# Altium PCB 12V-036A3（7X7）-WaterPump-200W-V1.0.PcbDoc (part 2 of 2)
Units mm, origin at the board's own origin, x right, y up, seen from the top; angles counter-clockwise.
Board outline 61.5 x 61.42 mm, 4 copper layers (Top Layer, Signal Layer 1, Signal Layer 2, Bottom Layer), stack 0.778 mm thick; 140 components, 56 nets, 337 pads, 796 vias.
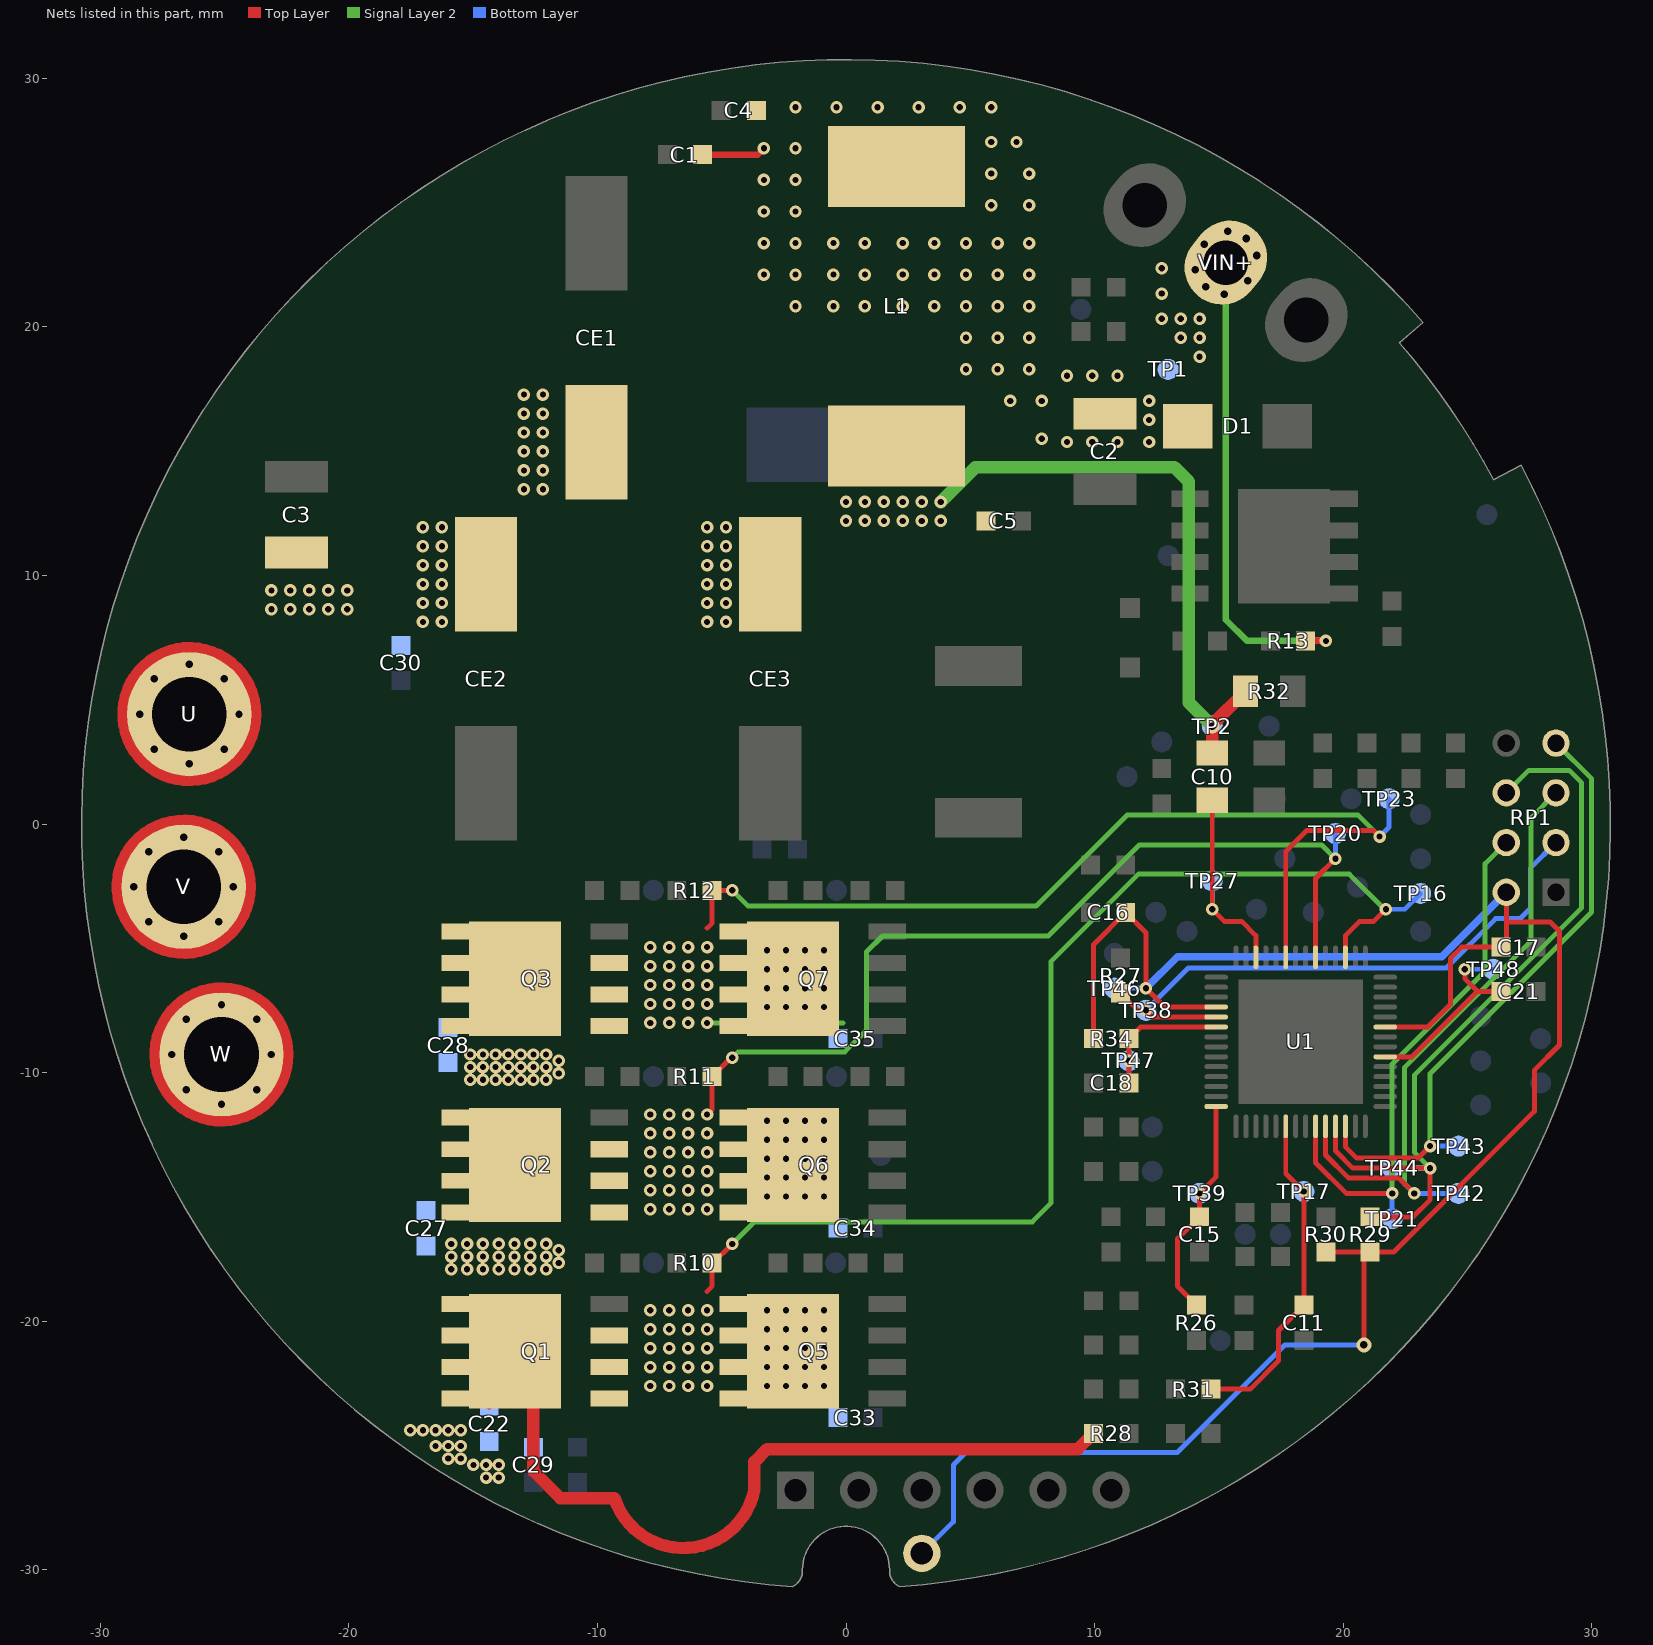
[diagram p4: the nets of this part, all layers, seen from the top]

## Via types
v1: diameter 0.5, hole 0.25, Top Layer to Bottom Layer, tented both sides, 744 vias
v2: diameter 0.6, hole 0.3, Top Layer to Bottom Layer, tented both sides, 28 vias
v3: diameter 0.61, hole 0.305, Top Layer to Bottom Layer, 24 vias

## Nets (pads, with @x,y where several pads share a name; then routed paths per layer and width w, separated by ;. In a path a pad name is that pad's centre, name@x,y a point inside that pad or via, vN(x,y) a via of type N, cw(c..) or ccw(c..) an arc to the next point about the centre after c; other vN are vias at no path point) (continued)
TCK: RP1.7 TP43.1 U1.12 | length 25.3
  Top Layer w0.2: U1.12@20.088,-12.163 20.088,-12.981 20.55,-13.443 23.006,-13.443 v1(23.495,-12.954)
  Signal Layer 2 w0.2: v1(23.495,-12.954) 23.495,-10.033 29.991,-3.537 29.991,1.822 RP1.7@28.559,3.254
  Bottom Layer w0.2: v1(23.495,-12.954) TP43.1@24.638,-12.954
TDI: RP1.4 TP21.1 U1.9 | length 22.1
  Top Layer w0.2: U1.9@18.888,-12.163 18.888,-13.623 20.124,-14.859 v1(21.971,-14.859)
  Signal Layer 2 w0.2: v1(21.971,-14.859) 21.971,-9.652 25.709,-5.914 25.709,-1.596 RP1.4@26.559,-0.746
  Bottom Layer w0.2: TP21.1@21.971,-15.875 v1(21.971,-14.859)
TDO: R29.2 RP1.6 TP44.1 U1.11 | length 32.7
  Top Layer w0.2: U1.11@19.688,-12.163 19.688,-13.146 20.385,-13.843 v1(23.495,-13.843) 23.495,-15.113 22.809,-15.799 R29.2@21.082,-15.799
  Signal Layer 2 w0.2: v1(23.495,-13.843) 22.86,-13.208 22.86,-10.102 29.591,-3.371 29.591,1.656 29.088,2.159 27.464,2.159 RP1.6@26.559,1.254
  Bottom Layer w0.2: TP44.1@21.971,-13.843 v1(23.495,-13.843)
TMS: RP1.5 TP42.1 U1.10 | length 25.9
  Top Layer w0.2: U1.10@19.288,-12.163 19.288,-13.312 20.219,-14.243 22.244,-14.243 v1(22.86,-14.859)
  Signal Layer 2 w0.2: v1(22.86,-14.859) 22.46,-14.459 22.46,-9.798 27.559,-4.699 27.559,0.254 RP1.5@28.559,1.254
  Bottom Layer w0.2: v1(22.86,-14.859) TP42.1@24.638,-14.859
TRSTn: R27.2 RP1.3 TP38.1 U1.47 | length 24.5
  Top Layer w0.2: R27.2@11.049,-6.807 11.735,-7.493 v1(12.065,-7.493) 12.335,-7.763 U1.47@14.888,-7.763
  Bottom Layer w0.2: v1(12.065,-7.493) 13.774,-5.784 24.157,-5.784 26.131,-3.81 27.114,-3.81 27.527,-3.397 27.527,-1.778 RP1.3@28.559,-0.746
U: C28.2 C35.1 Q3.1 Q3.2 Q3.3 Q7.5 Q7.6 Q7.7 Q7.8 Q7.9 R12.1 TP23.1 U1.37 U.1 | length 61.9
  Top Layer w0.2: -5.588,-4.191 -5.385,-3.988 R12.1@-5.385,-2.667 v1(-4.572,-2.667) ; U1.37@17.688,-5.363 17.688,-1.108 18.542,-0.254 21.209,-0.254 v1(21.463,-0.508)
  Top Layer w0.8: -23.916,4.42 ccw(c-26.416,4.42) -23.916,4.42
  Signal Layer 2 w0.2: v1(-5.588,-8.001) -0.127,-8.001 ; v1(-4.572,-2.667) -3.937,-3.302 7.645,-3.302 11.3,0.353 20.602,0.353 v1(21.463,-0.508)
  Bottom Layer w0.2: v1(21.463,-0.508) 21.844,-0.127 TP23.1@21.844,1.016
  other v1: -7.874,-8.001 -7.112,-8.001 -6.35,-8.001 -3.175,-7.366 -2.413,-7.366 -1.651,-7.366 -0.889,-7.366 -7.874,-7.239 -7.112,-7.239 -6.35,-7.239 -5.588,-7.239 -3.175,-6.604 -2.413,-6.604 -1.651,-6.604 -0.889,-6.604 -7.874,-6.477 -7.112,-6.477 -6.35,-6.477 -5.588,-6.477 -3.175,-5.842 -2.413,-5.842 -1.651,-5.842 -0.889,-5.842 -7.874,-5.715 -7.112,-5.715 -6.35,-5.715 -5.588,-5.715 -3.175,-5.08 -2.413,-5.08 -1.651,-5.08 -0.889,-5.08 -7.874,-4.953 -7.112,-4.953 -6.35,-4.953 -5.588,-4.953
  other v2: -26.416,2.42 -27.83,3.006 -25.002,3.006 -28.416,4.42 -24.416,4.42 -27.83,5.834 -25.002,5.834 -26.416,6.42
V: C27.2 C34.1 Q2.1 Q2.2 Q2.3 Q6.5 Q6.6 Q6.7 Q6.8 Q6.9 R11.1 TP20.1 U1.34 V.1 | length 53.6
  Top Layer w0.2: v1(-5.588,-11.684) -5.385,-11.481 R11.1@-5.385,-10.16 -4.623,-9.398 v1(-4.572,-9.398) ; U1.34@18.888,-5.363 18.888,-2.194 v1(19.685,-1.397)
  Top Layer w0.8: -24.141,-2.524 ccw(c-26.641,-2.524) -24.141,-2.524
  Signal Layer 2 w0.2: v1(-4.572,-9.398) -4.337,-9.163 -0.045,-9.163 0.827,-8.291 0.827,-5.142 1.467,-4.502 8.142,-4.502 11.797,-0.847 19.135,-0.847 v1(19.685,-1.397)
  Bottom Layer w0.2: v1(19.685,-1.397) TP20.1@19.685,-0.381
  other v1: -7.874,-15.494 -7.112,-15.494 -6.35,-15.494 -5.588,-15.494 -3.175,-14.986 -2.413,-14.986 -1.651,-14.986 -0.889,-14.986 -7.874,-14.732 -7.112,-14.732 -6.35,-14.732 -5.588,-14.732 -3.175,-14.224 -2.413,-14.224 -1.651,-14.224 -0.889,-14.224 -7.874,-13.97 -7.112,-13.97 -6.35,-13.97 -5.588,-13.97 -3.175,-13.462 -2.413,-13.462 -1.651,-13.462 -0.889,-13.462 -7.874,-13.208 -7.112,-13.208 -6.35,-13.208 -5.588,-13.208 -3.175,-12.7 -2.413,-12.7 -1.651,-12.7 -0.889,-12.7 -7.874,-12.446 -7.112,-12.446 -6.35,-12.446 -5.588,-12.446 -3.175,-11.938 -2.413,-11.938 -1.651,-11.938 -0.889,-11.938 -7.874,-11.684 -7.112,-11.684 -6.35,-11.684
  other v2: -26.641,-4.524 -28.055,-3.938 -25.227,-3.938 -28.641,-2.524 -24.641,-2.524 -28.055,-1.11 -25.227,-1.11 -26.641,-0.524
VBUS: C11.2 R31.2 TP17.1 U1.6 | length 13.3
  Top Layer w0.2: R31.2@14.681,-22.733 16.256,-22.733 17.399,-21.59 17.399,-20.371 C11.2@18.415,-19.355 v1(18.415,-14.783) 17.688,-14.056 U1.6@17.688,-12.163
VCP: C10.1 TP27.1 U1.40 | length 8.6
  Top Layer w0.2: C10.1@14.732,0.953 v1(14.732,-3.429) 15.221,-3.918 15.914,-3.918 16.488,-4.492 U1.40@16.488,-5.363
  Bottom Layer w0.2: v1(14.732,-3.429) TP27.1@14.732,-2.286
VDD: C21.2 TP48.1 U1.20 | length 8
  Top Layer w0.2: U1.20@21.688,-9.363 22.768,-9.363 25.4,-6.731 ; v1(24.892,-5.842) 24.892,-6.223 25.4,-6.731 ; C21.2@26.34,-6.731 25.4,-6.731
  Bottom Layer w0.2: v1(24.892,-5.842) TP48.1@26.035,-5.842
VDD5V: C16.2 C17.2 pad.1 R29.1 R30.1 R34.2 RP1.2 TP46.1 U1.23 U1.46 | length 86.3
  Top Layer w0.2: R34.2@9.957,-8.636 9.957,-4.851 C16.2@11.252,-3.556 12.065,-4.369 v1(12.065,-6.604) 12.824,-7.363 U1.46@14.888,-7.363 ; C16.2@11.189,-3.492 C16.2@11.252,-3.429 ; R30.1@19.304,-17.221 R29.1@20.955,-17.221 ; v2(20.828,-20.955) 20.828,-17.348 R29.1@20.955,-17.221 ; R29.1@21.018,-17.158 R29.1@21.082,-17.094 ; U1.23@21.688,-8.163 23.402,-8.163 24.314,-7.251 24.314,-5.404 24.765,-4.953 C17.2@26.34,-4.953 26.559,-4.734 26.559,-3.937 ; RP1.2@26.741,-2.746 RP1.2@26.559,-2.746 26.559,-3.937 ; R29.1@20.955,-17.221 R29.1@21.082,-17.221 22.022,-17.221 27.686,-11.557 27.686,-9.906 28.702,-8.89 28.702,-4.318 28.321,-3.937 26.559,-3.937
  Bottom Layer w0.2: pad.1@3.048,-29.337 4.318,-28.067 4.318,-25.781 4.826,-25.273 13.335,-25.273 17.653,-20.955 v2(20.828,-20.955) ; TP46.1@10.795,-6.604 v1(12.065,-6.604)
  Bottom Layer w0.3: v1(12.065,-6.604) 13.335,-5.334 23.971,-5.334 RP1.2@26.559,-2.746
VDDA: C15.2 R26.2 TP39.1 U1.56 | length 9
  Top Layer w0.2: R26.2@14.097,-19.355 13.335,-18.593 13.335,-16.688 C15.2@14.224,-15.799 v1(14.224,-14.859) 14.888,-14.195 U1.56@14.888,-11.363
VIN: C1.2 C2.1 C4.2 D1.2 L1.1 R13.2 TP1.1 VIN+.1 | length 22.1
  Top Layer w0.254: C1.2@-5.766,26.924 -3.556,26.924 v1(-3.302,27.178) ; R13.2@18.491,7.366 v1(19.304,7.366)
  Signal Layer 2 w0.254: VIN+.1@15.28,22.58 15.28,8.215 16.129,7.366 v1(19.304,7.366)
  other v1: 8.89,15.367 9.906,15.367 10.922,15.367 12.192,15.367 7.874,15.494 12.192,16.256 6.604,17.018 7.874,17.018 12.192,17.018 8.89,18.034 9.906,18.034 10.922,18.034 4.826,18.288 6.096,18.288 7.366,18.288 14.224,18.796 4.826,19.558 6.096,19.558 7.366,19.558 13.462,19.558 14.224,19.558 12.7,20.32 13.462,20.32 14.224,20.32 -2.032,20.828 -0.508,20.828 0.762,20.828 2.286,20.828 3.556,20.828 4.826,20.828 6.096,20.828 7.366,20.828 12.7,21.336 -3.302,22.098 -2.032,22.098 -0.508,22.098 0.762,22.098 2.286,22.098 3.556,22.098 4.826,22.098 6.096,22.098 7.366,22.098 12.7,22.352 -3.302,23.368 -2.032,23.368 -0.508,23.368 0.762,23.368 2.286,23.368 3.556,23.368 4.826,23.368 6.096,23.368 7.366,23.368 -3.302,24.638 -2.032,24.638 5.842,24.892 7.366,24.892 -3.302,25.908 -2.032,25.908 5.842,26.162 7.366,26.162 -2.032,27.178 5.842,27.432 6.858,27.432 -2.032,28.829 -0.381,28.829 1.27,28.829 2.921,28.829 4.572,28.829 5.842,28.829
  other v3: 15.211,21.312 14.464,21.607 16.156,21.845 14.043,22.292 16.517,22.868 14.404,23.315 16.096,23.553 15.349,23.848
VM: C3.1 C5.1 C10.2 C22.1 C27.1 C28.1 C29.1 C30.1 CE1.1 CE2.1 CE3.1 L1.2 Q1.5 Q1.6 Q1.7 Q1.8 Q1.9 Q2.5 Q2.6 Q2.7 Q2.8 Q2.9 Q3.5 Q3.6 Q3.7 Q3.8 Q3.9 R28.1 R32.2 TP2.1 | length 56.9
  Top Layer w0.381: Q1.8@-15.371,-23.114 -14.605,-23.114 Q1.9@-14.351,-23.368 ; Q1.9@-13.31,-21.209 Q1.9@-12.573,-21.946
  Top Layer w0.5: Q1.9@-12.573,-21.946 -12.573,-26.035 -11.495,-27.113 -9.315,-27.113 ccw(c-6.545,-26.212) -3.687,-26.771 -3.687,-25.658 -3.175,-25.146 9.322,-25.146 R28.1@9.957,-24.511
  Top Layer w0.508: C10.2@14.732,2.857 v2(14.732,3.937) 14.732,4 R32.2@16.066,5.334
  Signal Layer 2 w0.508: v1(3.81,12.954) 5.207,14.351 13.208,14.351 13.791,13.768 13.791,4.878 v2(14.732,3.937)
  other v1: -14.478,-26.289 -13.97,-26.289 -14.986,-25.781 -14.478,-25.781 -13.97,-25.781 -16.002,-25.527 -15.494,-25.527 -16.51,-25.019 -16.002,-25.019 -15.494,-25.019 -17.526,-24.384 -17.018,-24.384 -16.51,-24.384 -16.002,-24.384 -15.494,-24.384 -15.875,-17.907 -15.24,-17.907 -14.605,-17.907 -13.97,-17.907 -13.335,-17.907 -12.7,-17.907 -12.065,-17.907 -11.557,-17.653 -15.875,-17.399 -15.24,-17.399 -14.605,-17.399 -13.97,-17.399 -13.335,-17.399 -12.7,-17.399 -12.065,-17.399 -11.557,-17.145 -15.875,-16.891 -15.24,-16.891 -14.605,-16.891 -13.97,-16.891 -13.335,-16.891 -12.7,-16.891 -12.065,-16.891 -15.113,-10.287 -14.605,-10.287 -14.097,-10.287 -13.589,-10.287 -13.081,-10.287 -12.573,-10.287 -12.065,-10.287 -11.557,-10.033 -15.113,-9.779 -14.605,-9.779 -14.097,-9.779 -13.589,-9.779 -13.081,-9.779 -12.573,-9.779 -12.065,-9.779 -11.557,-9.525 -15.113,-9.271 -14.605,-9.271 -14.097,-9.271 -13.589,-9.271 -13.081,-9.271 -12.573,-9.271 -12.065,-9.271 -17.018,8.128 -16.256,8.128 -5.588,8.128 -4.826,8.128 -23.114,8.636 -22.352,8.636 -21.59,8.636 -20.828,8.636 -20.066,8.636 -17.018,8.89 -16.256,8.89 -5.588,8.89 -4.826,8.89 -23.114,9.398 -22.352,9.398 -21.59,9.398 -20.828,9.398 -20.066,9.398 -17.018,9.652 -16.256,9.652 -5.588,9.652 -4.826,9.652 -17.018,10.414 -16.256,10.414 -5.588,10.414 -4.826,10.414 -17.018,11.176 -16.256,11.176 -5.588,11.176 -4.826,11.176 -17.018,11.938 -16.256,11.938 -5.588,11.938 -4.826,11.938 0,12.192 0.762,12.192 1.524,12.192 2.286,12.192 3.048,12.192 3.81,12.192 0,12.954 0.762,12.954 1.524,12.954 2.286,12.954 3.048,12.954 -12.954,13.462 -12.192,13.462 -12.954,14.224 -12.192,14.224 -12.954,14.986 -12.192,14.986 -12.954,15.748 -12.192,15.748 -12.954,16.51 -12.192,16.51 -12.954,17.272 -12.192,17.272
W: C22.2 C33.1 Q1.1 Q1.2 Q1.3 Q5.5 Q5.6 Q5.7 Q5.8 Q5.9 R10.1 TP16.1 U1.31 W.1 | length 61.4
  Top Layer w0.2: -5.588,-18.796 -5.385,-18.593 R10.1@-5.385,-17.653 -5.334,-17.653 v1(-4.572,-16.891) ; U1.31@20.088,-5.363 20.088,-4.492 20.662,-3.918 21.228,-3.918 v1(21.717,-3.429)
  Top Layer w0.8: -22.621,-9.271 ccw(c-25.121,-9.271) -22.621,-9.271
  Signal Layer 2 w0.2: v1(-4.572,-16.891) -3.683,-16.002 7.493,-16.002 8.255,-15.24 8.255,-5.52 11.756,-2.019 20.249,-2.019 21.659,-3.429 v1(21.717,-3.429)
  Bottom Layer w0.2: v1(21.717,-3.429) 22.479,-3.429 TP16.1@23.114,-2.794
  other v1: -7.874,-22.606 -7.112,-22.606 -6.35,-22.606 -5.588,-22.606 -3.175,-22.606 -2.413,-22.606 -1.651,-22.606 -0.889,-22.606 -7.874,-21.844 -7.112,-21.844 -6.35,-21.844 -5.588,-21.844 -3.175,-21.844 -2.413,-21.844 -1.651,-21.844 -0.889,-21.844 -7.874,-21.082 -7.112,-21.082 -6.35,-21.082 -5.588,-21.082 -3.175,-21.082 -2.413,-21.082 -1.651,-21.082 -0.889,-21.082 -7.874,-20.32 -7.112,-20.32 -6.35,-20.32 -5.588,-20.32 -3.175,-20.32 -2.413,-20.32 -1.651,-20.32 -0.889,-20.32 -7.874,-19.558 -7.112,-19.558 -6.35,-19.558 -5.588,-19.558 -3.175,-19.558 -2.413,-19.558 -1.651,-19.558 -0.889,-19.558
  other v2: -25.121,-11.271 -26.535,-10.685 -23.707,-10.685 -27.121,-9.271 -23.121,-9.271 -26.535,-7.857 -23.707,-7.857 -25.121,-7.271
XRS: C18.1 R34.1 TP47.1 U1.48 | length 5.5
  Top Layer w0.2: C18.1@11.379,-10.414 R34.1@11.379,-8.636 11.852,-8.163 12.684,-8.163 U1.48@14.888,-8.163
  other v1: 11.379,-9.525
pads on no net: U1.17 U1.18 U1.21 U1.22

## Polygon pours and split planes (outlines as drawn)
GND on Bottom Layer "GND_L02_P064" (solid, remove dead copper, pour order 108): 9.398,3.937 9.398,-23.622 7.874,-25.146 7.874,-29.21 8.636,-29.972 27.178,-29.972 32.385,-24.765 32.385,3.302 31.369,4.318 9.779,4.318
NetC19_1 on Bottom Layer "NETC19_1_L04_P004" (solid, remove dead copper, pour order 4): 21.463,25.654 15.621,19.812 15.621,8.636 15.748,8.509 24.003,8.509 28.194,12.7 28.194,18.415 20.955,25.654
VIN on Bottom Layer "VIN_L04_P018" (solid, remove dead copper, pour order 18): -4.064,30.988 -4.064,18.669 -3.302,17.907 3.81,17.907 6.731,14.986 14.732,14.986 15.24,15.494 15.24,20.066 19.812,24.638 19.812,26.797 14.732,31.877 -3.175,31.877
GND on Bottom Layer "GND_L04_P032" (solid, remove dead copper, pour order 32): 6.985,13.97 13.97,13.97 14.605,13.335 14.605,9.398 9.906,4.699 3.302,4.699 2.286,3.683 2.286,1.524 0.508,-0.254 -12.446,-0.254 -16.002,3.302 -16.002,5.588 -15.24,6.35 -1.905,6.35 2.54,10.795 6.096,10.795 6.477,11.176 6.477,13.462
VM on Bottom Layer "VM_L04_P066" (solid, remove dead copper, pour order 66): -24.511,11.811 -24.511,7.493 -23.749,6.731 -2.159,6.731 2.286,11.176 5.842,11.176 6.096,11.43 6.096,13.081 5.715,13.462 -4.445,13.462 -5.08,14.097 -5.08,18.288 -5.461,18.669 -12.827,18.669 -19.177,12.319 -24.003,12.319
R+ on Bottom Layer "R+_L04_P074" (solid, remove dead copper, pour order 74): 8.001,1.905 3.683,1.905 0.635,-1.143 0.635,-24.257 0.762,-24.384 2.032,-24.384 8.001,-24.384 8.763,-23.622 8.763,1.143
W on Bottom Layer "W_L04_P076" (solid, remove dead copper, pour order 76): -24.638,-5.842 -22.225,-8.255 -22.225,-12.7 -16.51,-18.415 -0.127,-18.415 0.127,-18.669 0.127,-23.622 -0.127,-23.876 -26.035,-23.876 -30.734,-19.177 -30.734,-7.874 -28.702,-5.842
V on Bottom Layer "V_L04_P082" (solid, remove dead copper, pour order 82): -29.591,0 -29.591,-4.572 -28.702,-5.461 -24.511,-5.461 -21.844,-8.128 -21.844,-12.573 -18.161,-16.256 -0.254,-16.256 0.127,-15.875 0.127,-11.43 -0.381,-10.922 -16.256,-10.922 -16.764,-10.414 -16.764,-6.096 -23.749,0.889 -28.702,0.889
U on Bottom Layer "U_L04_P086" (solid, remove dead copper, pour order 86): -29.591,6.096 -29.591,2.159 -28.702,1.27 -23.622,1.27 -16.383,-5.969 -16.383,-8.636 -16.256,-8.763 -0.381,-8.763 0.127,-8.255 0.127,-4.064 0.127,-3.81 -0.254,-3.429 -11.176,-3.429 -20.955,6.35 -23.876,6.35 -24.892,7.366 -28.321,7.366
VM on Bottom Layer "VM_L04_P092" (solid, remove dead copper, pour order 92): -12.446,-24.13 -12.065,-24.511 -12.065,-25.527 -12.192,-25.654 -13.081,-25.654 -13.335,-25.908 -13.335,-26.67 -13.716,-27.051 -18.034,-27.051 -18.669,-26.416 -18.669,-24.638 -18.161,-24.13
NetC19_1 on Top Layer "NETC19_1_L01_P002" (solid, remove dead copper, pour order 2): 21.463,25.654 15.621,19.812 15.621,8.636 15.748,8.509 24.003,8.509 28.194,12.7 28.194,18.415 20.955,25.654
VIN on Top Layer "VIN_L01_P012" (solid, remove dead copper, pour order 12): -4.064,21.59 -2.032,19.558 2.794,19.558 7.62,14.732 14.478,14.732 15.24,15.494 15.24,20.066 19.812,24.638 19.812,25.4 18.288,26.924 16.764,26.924 12.192,22.352 12.192,19.304 11.811,18.923 8.763,18.923 8.636,19.05 8.636,26.67 5.588,29.718 -3.556,29.718 -4.064,29.21
GND on Top Layer "GND_L01_P030" (solid, remove dead copper, pour order 30): 7.239,14.224 14.478,14.224 15.113,13.589 15.113,10.16 14.859,9.906 12.7,9.906 12.573,9.779 12.573,8.255 12.192,7.874 9.398,7.874 8.763,7.239 8.763,4.953 8.509,4.699 3.302,4.699 2.286,3.683 2.286,1.524 -0.381,-1.143 -16.002,-1.143 -16.764,-0.381 -16.764,4.826 -15.24,6.35 -1.905,6.35 2.54,10.795 6.096,10.795 6.477,11.176 6.477,13.462
GND on Top Layer "GND_L01_P068" (solid, remove dead copper, pour order 68): -27.813,20.828 -27.813,14.732 -25.908,12.827 -19.558,12.827 -13.031,19.354 -6.808,19.354 -6.604,19.558 -6.604,27.432 -6.096,27.94 -4.699,27.94 -4.572,28.067 -4.572,31.623 -5.715,32.766 -15.875,32.766
VM on Top Layer "VM_L01_P090" (solid, remove dead copper, pour order 90): 6.096,15.621 6.096,11.43 5.842,11.176 2.286,11.176 -2.159,6.731 -15.494,6.731 -17.145,5.08 -17.145,-0.762 -16.002,-1.905 -11.557,-1.905 -11.303,-2.159 -11.303,-25.4 -13.335,-27.432 -20.955,-27.432 -28.067,-20.32 -28.067,-14.351 -26.543,-12.827 -23.622,-12.827 -21.844,-11.049 -21.844,-7.366 -23.114,-6.096 -23.114,6.096 -24.511,7.493 -24.511,11.811 -24.003,12.319 -19.177,12.319 -12.827,18.669 3.048,18.669
GND on Signal Layer 1 "GND_L02_P064" (solid, remove dead copper, pour order 64): 9.398,3.937 9.398,-23.622 7.874,-25.146 7.874,-29.21 8.636,-29.972 27.178,-29.972 32.385,-24.765 32.385,3.302 31.369,4.318 9.779,4.318
GND on Signal Layer 1 "GND_L02_P052" (solid, remove dead copper, pour order 52): -31.115,28.321 -31.115,10.033 -28.702,7.62 -21.59,7.62 -12.827,-1.143 -0.254,-1.143 2.413,1.524 2.413,3.81 3.302,4.699 11.938,4.699 14.859,7.62 14.859,13.843 14.478,14.224 7.493,14.224 2.667,19.05 -2.286,19.05 -4.572,21.336 -4.572,29.845 -8.255,33.528 -25.908,33.528
NetC19_1 on Signal Layer 1 "NETC19_1_L02_P006" (solid, remove dead copper, pour order 6): 21.463,25.654 15.621,19.812 15.621,8.636 15.748,8.509 24.003,8.509 28.194,12.7 28.194,18.415 20.955,25.654
VIN on Signal Layer 1 "VIN_L02_P016" (solid, remove dead copper, pour order 16): -4.064,30.988 -4.064,21.59 -2.032,19.558 2.794,19.558 7.62,14.732 14.478,14.732 15.24,15.494 15.24,20.066 19.812,24.638 19.812,26.797 14.732,31.877 -3.175,31.877
R+ on Signal Layer 1 "R+_L02_P028" (solid, remove dead copper, pour order 28): 8.001,1.905 3.683,1.905 0.635,-1.143 0.635,-23.876 1.143,-24.384 2.032,-24.384 7.366,-24.384 8.763,-22.987 8.763,1.143
W on Signal Layer 1 "W_L02_P078" (solid, remove dead copper, pour order 78): -24.638,-5.842 -22.225,-8.255 -22.225,-12.7 -16.51,-18.415 -0.127,-18.415 0.127,-18.669 0.127,-23.622 -0.127,-23.876 -26.035,-23.876 -30.734,-19.177 -30.734,-7.874 -28.702,-5.842
V on Signal Layer 1 "V_L02_P084" (solid, remove dead copper, pour order 84): -29.591,0 -29.591,-4.572 -28.702,-5.461 -24.511,-5.461 -21.844,-8.128 -21.844,-12.573 -18.161,-16.256 -0.254,-16.256 0.127,-15.875 0.127,-11.43 -0.381,-10.922 -16.002,-10.922 -16.764,-10.16 -16.764,-6.096 -23.749,0.889 -28.702,0.889
U on Signal Layer 1 "U_L02_P088" (solid, remove dead copper, pour order 88): -29.591,6.096 -29.591,2.159 -28.702,1.27 -23.622,1.27 -16.383,-5.969 -16.383,-8.382 -16.002,-8.763 -0.381,-8.763 0.127,-8.255 0.127,-4.064 0.127,-3.81 -0.254,-3.429 -11.176,-3.429 -20.955,6.35 -23.876,6.35 -24.892,7.366 -28.321,7.366
VM on Signal Layer 1 "VM_L02_P096" (solid, remove dead copper, pour order 96): -13.843,-24.13 -13.335,-24.638 -13.335,-26.797 -13.716,-27.178 -16.891,-27.178 -18.161,-25.908 -18.161,-24.257 -18.034,-24.13
GND on Signal Layer 2 "GND_L02_P064" (solid, remove dead copper, pour order 102): 9.398,3.937 9.398,-23.622 7.874,-25.146 7.874,-29.21 8.636,-29.972 27.178,-29.972 32.385,-24.765 32.385,3.302 31.369,4.318 9.779,4.318
GND on Signal Layer 2 "GND_L03_P056" (solid, remove dead copper, pour order 56): -27.813,19.939 -27.813,14.732 -25.908,12.827 -19.558,12.827 -13.031,19.354 -6.808,19.354 -4.572,21.59 -4.572,31.623 -5.588,32.639 -15.113,32.639
NetC19_1 on Signal Layer 2 "NETC19_1_L03_P010" (solid, remove dead copper, pour order 10): 21.463,25.654 15.621,19.812 15.621,8.636 15.748,8.509 24.003,8.509 28.194,12.7 28.194,18.415 20.955,25.654
VIN on Signal Layer 2 "VIN_L03_P020" (solid, remove dead copper, pour order 20): -4.064,32.004 -4.064,21.59 -2.032,19.558 2.794,19.558 7.493,14.859 12.7,14.859 13.208,15.367 13.208,16.764 11.049,18.923 8.89,18.923 8.636,19.177 8.636,32.131 8.128,32.639 -3.429,32.639
GND on Signal Layer 2 "GND_L03_P040" (solid, remove dead copper, pour order 40): 6.864,13.849 12.694,13.849 13.208,13.335 13.208,5.969 11.938,4.699 3.302,4.699 2.286,3.683 2.286,1.524 -0.381,-1.143 -12.827,-1.143 -14.224,0.254 -14.224,6.096 -13.97,6.35 -1.905,6.35 2.54,10.795 6.096,10.795 6.477,11.176 6.477,13.462
VM on Signal Layer 2 "VM_L03_P094" (solid, remove dead copper, pour order 94): 6.096,15.621 6.096,11.43 5.842,11.176 2.286,11.176 -2.159,6.731 -14.351,6.731 -14.732,6.35 -14.732,-0.127 -12.954,-1.905 -11.557,-1.905 -11.303,-2.159 -11.303,-25.4 -13.335,-27.432 -20.955,-27.432 -28.067,-20.32 -28.067,-14.351 -26.543,-12.827 -23.622,-12.827 -21.844,-11.049 -21.844,-7.366 -23.114,-6.096 -23.114,6.096 -24.511,7.493 -24.511,11.811 -24.003,12.319 -19.177,12.319 -12.827,18.669 3.048,18.669

## Keep-outs
Bottom Layer:
  circle w0.127: c-19.422,18.756 r3
  circle w0.127: c-6.532,-26.198 r3
Keep-Out Layer:
  circle w0.127: c-19.422,18.756 r1.8
  circle w0.127: c25.954,7.442 r3
  circle w0.127: c25.954,7.442 r1.8
  circle w0.127: c-6.532,-26.198 r1.8
  lines w0.127: -2.145,-30.675 ccw(c-2.484,-30.024) -1.75,-30 cw(c0,-30) 1.75,-30 ccw(c2.484,-30.024) 2.145,-30.675 ccw(c0,0) 27.151,14.436 26.047,13.849 ccw(c0,0) 22.264,19.354 23.207,20.174 ccw(c0,0) -2.145,-30.675

## Other copper
Top Layer:
  rectangle net GND: 9.398,-3.937 10.287,1.397
  rectangle net GND: 9.525,-14.478 10.414,-10.033
  region net R+: 3.683,1.905 1.397,-0.381 1.397,-3.302 1.651,-3.556 2.54,-3.556 2.794,-3.81 2.794,-4.699 2.54,-4.953 0.889,-4.953 0.762,-5.08 0.762,-8.763 1.397,-9.398 1.397,-10.668 1.651,-10.922 2.54,-10.922 2.794,-11.176 2.794,-12.192 2.54,-12.446 0.889,-12.446 0.762,-12.573 0.762,-16.383 1.397,-17.018 1.397,-18.288 1.651,-18.542 2.54,-18.542 2.794,-18.796 2.794,-19.685 2.54,-19.939 0.889,-19.939 0.762,-20.066 0.762,-24.003 1.143,-24.384 7.366,-24.384 8.128,-23.622 8.128,1.27 7.493,1.905
  region net V: -10.795,-12.827 -10.795,-16.002 -10.414,-16.383 0,-16.383 0.254,-16.129 0.254,-11.557 -0.381,-10.922 -8.001,-10.922 -8.255,-11.176 -8.255,-12.192 -8.509,-12.446 -10.414,-12.446
  region net U: -10.795,-5.334 -10.795,-8.509 -10.414,-8.89 0,-8.89 0.254,-8.636 0.254,-4.064 -0.381,-3.429 -8.001,-3.429 -8.255,-3.683 -8.255,-4.699 -8.509,-4.953 -10.414,-4.953
  region net W: -10.795,-20.32 -10.795,-23.495 -10.414,-23.876 0,-23.876 0.254,-23.622 0.254,-19.05 -0.381,-18.415 -8.001,-18.415 -8.255,-18.669 -8.255,-19.685 -8.509,-19.939 -10.414,-19.939
Signal Layer 1:
  region net VM: 4.318,13.462 -0.508,13.462 -0.508,11.684 4.318,11.684
  region net VM: -4.318,7.62 -4.318,12.446 -6.096,12.446 -6.096,7.62
  region net VM: -11.684,12.954 -11.684,17.78 -13.462,17.78 -13.462,12.954
  region net VM: -15.748,7.62 -15.748,12.446 -17.526,12.446 -17.526,7.62
  rectangle net VM: -23.622,8.128 -19.558,9.906
  rectangle net VM: -16.256,-18.161 -11.303,-16.637
  rectangle net VM: -15.748,-10.541 -11.303,-9.017
  rectangle net GND: 9.779,3.556 11.938,6.096
  pour cut-out: 10.922,2.286 ccw(c11.303,1.905) 10.922,1.524 ccw(c11.303,1.905) 11.684,1.524 ccw(c11.303,1.905) 11.684,2.286 ccw(c11.303,1.905)
Signal Layer 2:
  pour cut-out: 10.922,2.286 ccw(c11.303,1.905) 10.922,1.524 ccw(c11.303,1.905) 11.684,1.524 ccw(c11.303,1.905) 11.684,2.286 ccw(c11.303,1.905)
  region net R+: 7.493,-5.334 7.874,-5.715 7.874,-15.113 7.366,-15.621 1.016,-15.621 0.635,-15.24 0.635,-9.779 1.651,-8.763 1.651,-5.715 2.032,-5.334
  region net R+: 3.683,1.905 0.635,-1.143 0.635,-2.159 1.016,-2.54 7.239,-2.54 8.763,-1.016 8.763,1.143 8.001,1.905
  region net U: -10.287,-8.001 -9.906,-8.382 -0.254,-8.382 0.127,-8.001 0.127,-4.699 -0.254,-4.318 -9.398,-4.318 -10.287,-5.207
  region net V: -10.541,-15.748 -9.906,-16.383 -4.826,-16.383 -4.064,-15.621 -0.381,-15.621 0.254,-14.986 0.254,-11.684 -0.254,-11.176 -9.906,-11.176 -10.541,-11.811
  region net R+: 0.635,-23.241 1.016,-23.622 8.382,-23.622 8.763,-23.241 8.763,-17.526 8.382,-17.145 1.27,-17.145 0.635,-17.78
  region net W: -10.541,-18.923 -10.541,-23.368 -10.033,-23.876 -0.381,-23.876 0.254,-23.241 0.254,-19.05 -0.254,-18.542 -10.16,-18.542
Bottom Layer:
  rectangle net GND: -8.763,20.828 -6.858,26.416
  rectangle net GND: -24.511,14.732 -21.463,16.129
  pour cut-out: 10.922,2.286 ccw(c11.303,1.905) 10.922,1.524 ccw(c11.303,1.905) 11.684,1.524 ccw(c11.303,1.905) 11.684,2.286 ccw(c11.303,1.905)
  region net VM: -17.145,-17.272 -16.256,-18.161 -11.557,-18.161 -11.303,-17.907 -11.303,-16.764 -11.557,-16.51 -16.637,-16.51 -17.145,-17.018
  region net VM: -16.002,-9.017 -16.383,-9.398 -16.383,-10.033 -15.875,-10.541 -11.557,-10.541 -11.303,-10.287 -11.303,-9.271 -11.557,-9.017

## Silkscreen, mask and mechanical layers (free items; w line width, h text height)
Top Overlay:
  text "25-05-09" at -19.812,-19.177 h0.8 r90
  text "ADM32F036A3" at -22.225,-19.431 h0.8 r90
  text "12V-WaterPump-V1.0" at -20.955,-20.447 h0.8 r90
  text "IO32" at 3.937,-25.146 h0.8 r90
  text "SIMO" at 4.953,-25.146 h0.8 r90
  text "SOMI" at 5.969,-25.146 h0.8 r90
  text "STE/IO19" at 6.985,-25.146 h0.8 r90
  text "SCLK" at 8.001,-25.146 h0.8 r90
  text "GND" at 9.017,-25.146 h0.8 r90
  text "+5V" at 4.699,-29.464 h0.8
Bottom Overlay:
  text "PWM/LIN" at 9.906,22.098 h1
  text "LIN-IN" at 8.763,20.32 h0.6
  text "VIN+" at 13.97,19.812 h1
  text "VBAT-IN" at 12.192,18.034 h0.6
  text "VIN-" at 16.764,17.018 h1
  text "GND-IN" at 27.94,11.049 h0.6
  text "GND" at 13.97,9.398 h0.6
  text "LIN_EN" at 23.495,4.191 h0.6 r90
  text "CPL" at 13.335,4.064 h0.6
  text "U" at -21.844,3.937 h1
  text "VM" at 15.367,2.54 h0.6
  text "GND" at 17.78,2.54 h0.6
  text "U" at 22.098,1.905 h0.6
  text "ADM32F036A3QN56Q-7X7" at 9.144,1.778 h1
  text "LIN" at 20.574,1.778 h0.6
  text "LU" at 16.637,0.762 h0.6
  text "COM" at 11.938,0.508 h0.6
  text "LDO_IN" at 16.637,0.381 h0.6 r90
  text "V" at 19.05,-0.762 h0.6
  text "VCP" at 15.494,-1.651 h0.6
  text "HU" at 25.273,-1.778 h0.6
  text "AVDD" at 13.081,-2.794 h0.6
  text "LV" at 18.288,-2.794 h0.6
  text "HV" at 19.939,-2.794 h0.6
  text "UH" at -8.382,-2.921 h0.6
  text "UL" at -1.27,-2.921 h0.6
  text "W" at 24.384,-3.175 h0.6
  text "V" at -22.098,-3.429 h1
  text "HW" at 25.146,-4.699 h0.6
  text "LW" at 19.304,-4.826 h0.6
  text "GND" at 10.033,-5.588 h0.6
  text "CPH" at 14.605,-5.715 h0.6
  text "1V2" at 28.194,-6.096 h0.6
  text "+5V" at 10.033,-6.858 h0.6
  text "TRST" at 13.335,-7.239 h0.6 r90
  text "SIMO" at 29.21,-8.001 h0.6
  text "IO32" at 24.638,-8.128 h0.6
  text "W" at -21.209,-9.906 h1
  text "XRS" at 10.668,-9.906 h0.6
  text "SOMI" at 24.511,-9.906 h0.6
  text "VH" at -8.509,-10.541 h0.6
  text "VL" at -1.27,-10.541 h0.6
  text "STE" at 27.813,-11.049 h0.6 r90
  text "SCLK" at 24.511,-11.557 h0.6
  text "IBUS" at 11.557,-12.573 h0.6
  text "VBUS" at 18.923,-13.97 h0.6
  text "TDO" at 21.209,-14.097 h0.6
  text "OC" at 11.43,-14.224 h0.6
  text "TCK" at 25.527,-14.224 h0.6
  text "R+" at 1.905,-14.605 h0.6
  text "TDI" at 21.209,-16.002 h0.6
  text "TMS" at 25.527,-16.129 h0.6
  text "VDDA" at 14.859,-16.383 h0.6
  text "OP1N" at 16.383,-17.272 h0.6 r90
  text "OP1OUT" at 17.78,-17.272 h0.6 r90
  text "WH" at -8.509,-17.907 h0.6
  text "WL" at -1.27,-17.907 h0.6
  text "OP1P" at 13.97,-21.336 h0.6
Bottom Solder:
  rectangle: 16.129,-10.795 20.447,-6.477
  rectangle: -8.636,-7.62 -0.508,-3.937
  rectangle: -8.636,-15.24 -0.381,-11.43
  rectangle: -8.636,-22.86 -0.381,-19.177
  rectangle: 2.413,4.699 8.509,9.779
  rectangle: 15.875,8.763 20.447,13.589
  rectangle: -14.859,-18.161 -11.811,-16.637
  rectangle: -14.351,-10.541 -11.811,-9.017
  region: 7.747,1.27 3.175,1.27 1.905,0 1.905,-3.556 2.54,-4.191 2.54,-23.749 2.667,-23.876 7.747,-23.876 8.001,-23.622 8.001,-3.302 8.001,1.016